# Altium PCB A313_3.PcbDoc (part 1 of 3)
Units mm, origin at the board's own origin, x right, y up, seen from the top; angles counter-clockwise.
Board outline 230.01 x 157.01 mm, 2 copper layers (Top Layer, Bottom Layer); 198 components, 173 nets, 1021 pads, 579 vias.
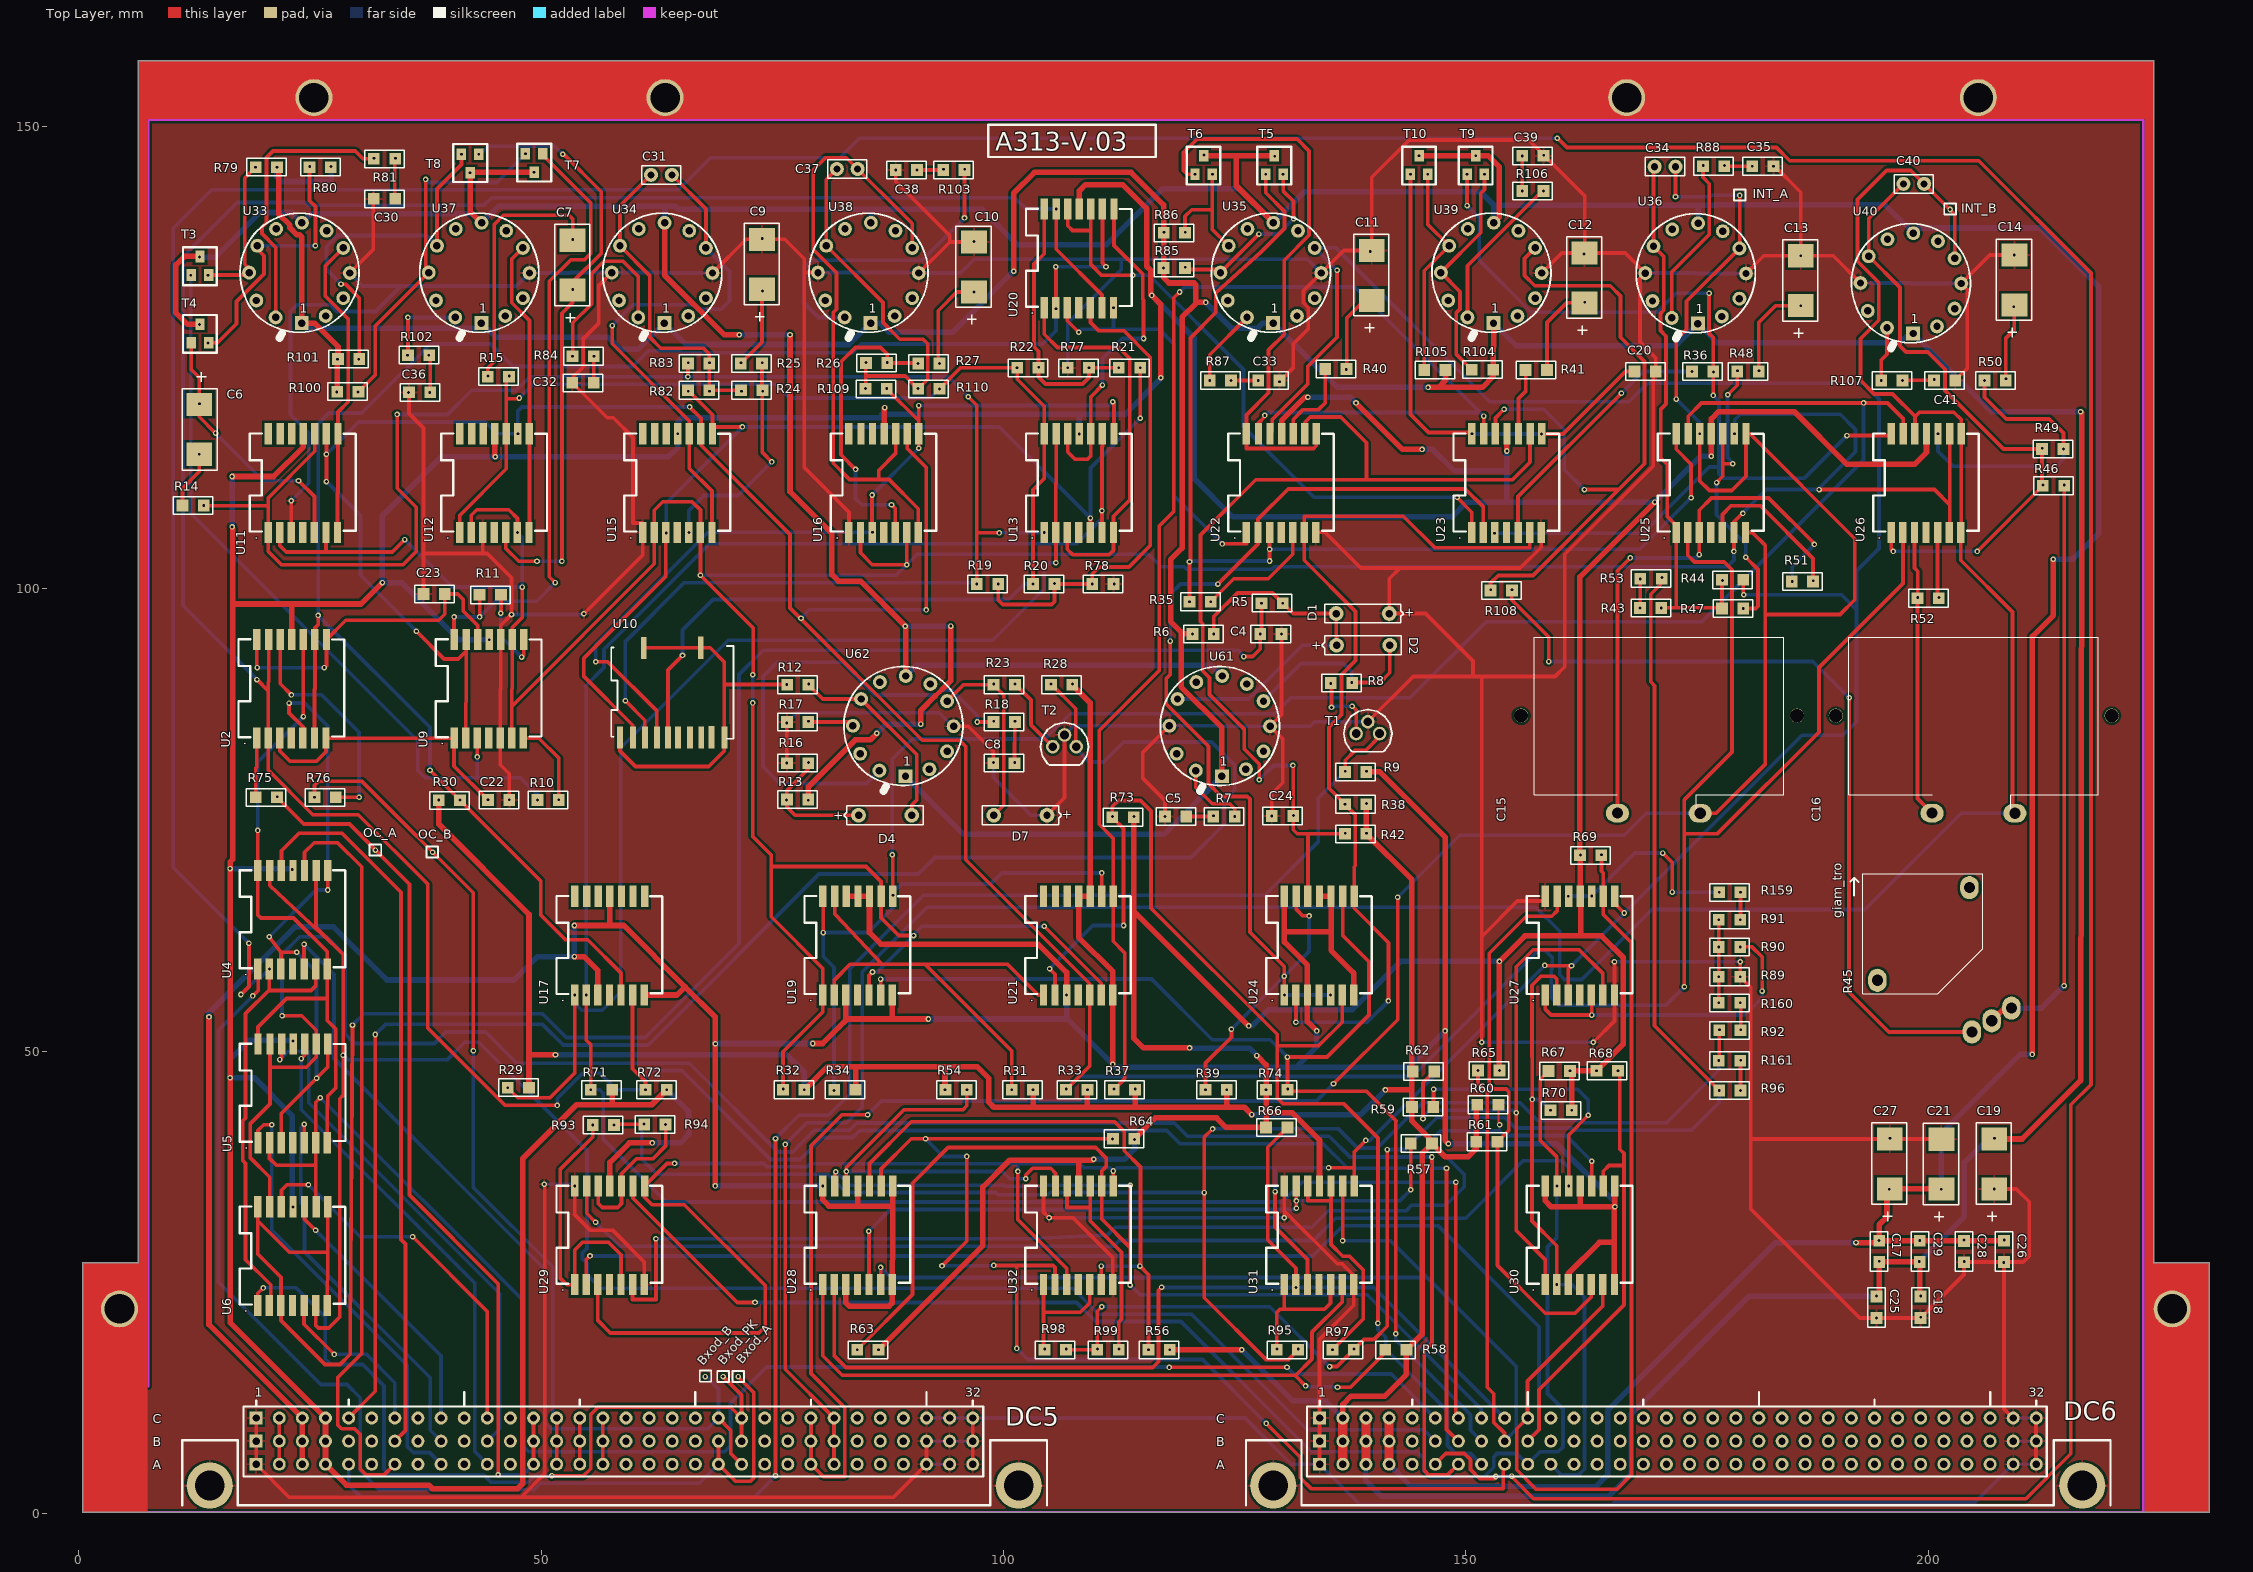
[diagram p0: Top Layer view]
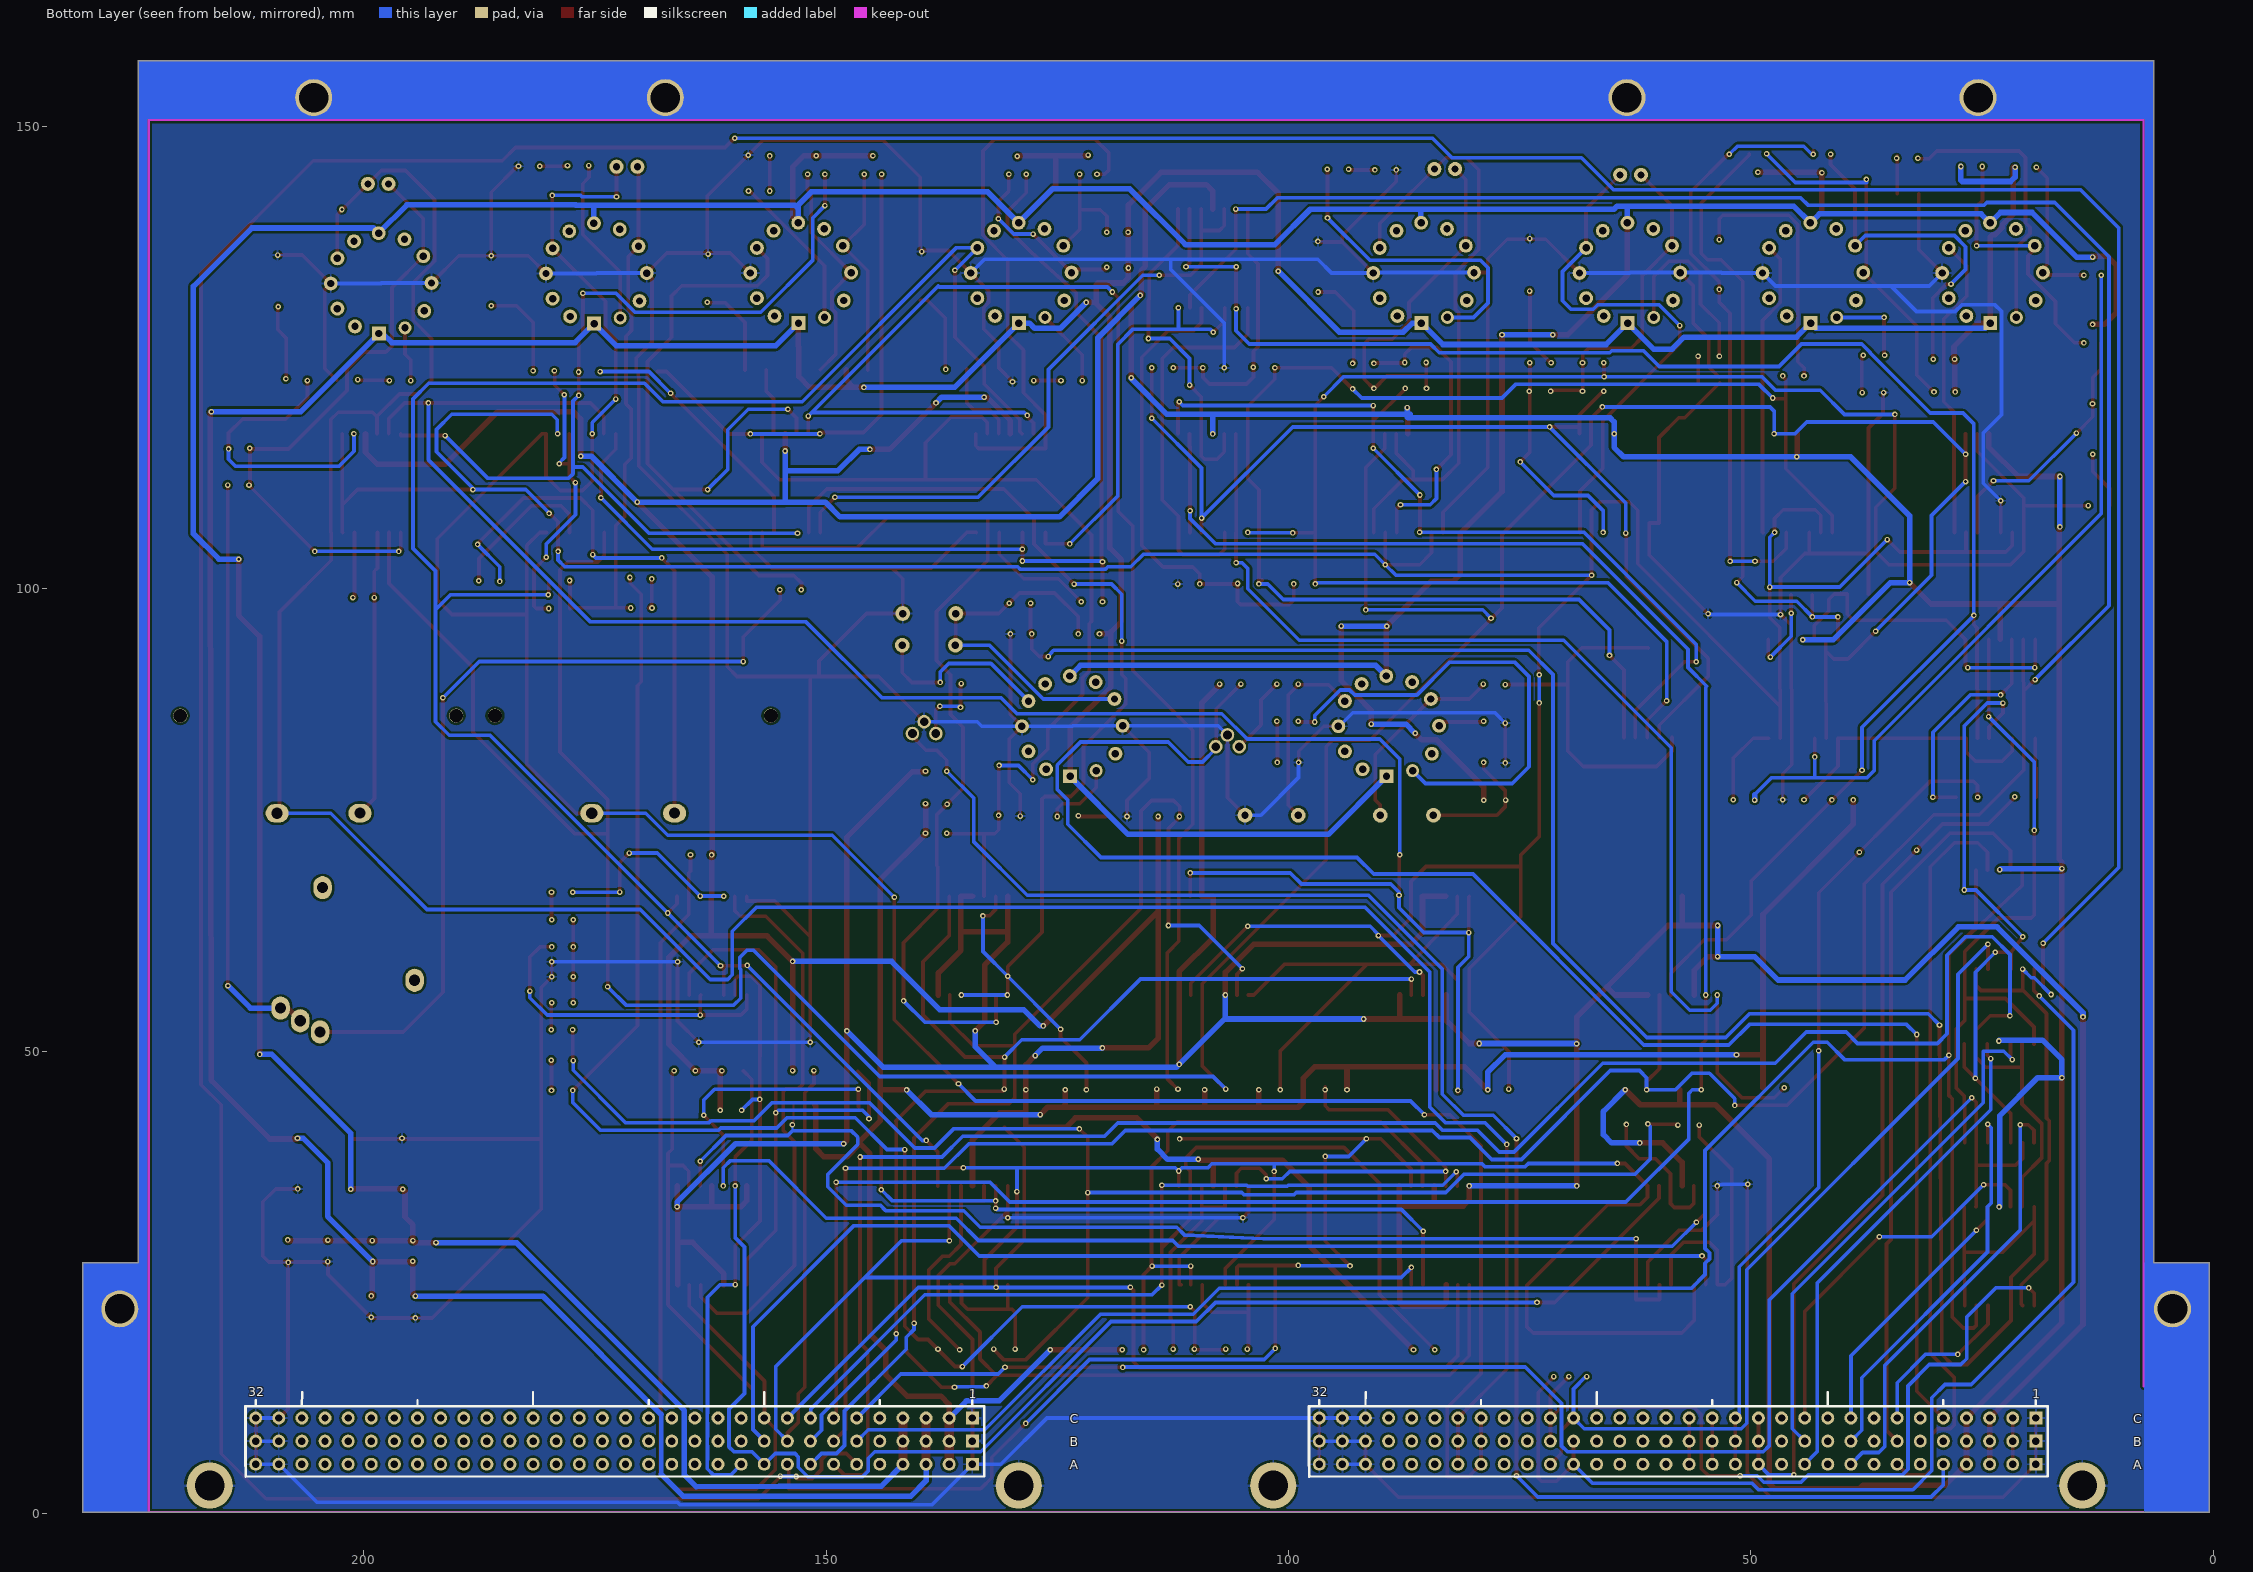
[diagram p1: Bottom Layer view, seen from below]

## Layer stack, top to bottom
Top Solder: solder mask 0.0102, Solder Resist, Dk 3.5
Top Layer: signal copper 0.0356
Dielectric 1: dielectric 0.32, FR-4, Dk 4.8
Bottom Layer: signal copper 0.0356
Bottom Solder: solder mask 0.0102, Solder Resist, Dk 3.5

## Board outline
0.405,0.121 0.405,27.121 cw(c0.412,27.121) 0.412,27.128 6.405,27.128 6.405,157.121 cw(c6.412,157.121) 6.412,157.128 224.412,157.128 cw(c224.412,157.121) 224.419,157.121 224.419,27.128 230.412,27.128 cw(c230.412,27.121) 230.419,27.121 230.419,0.121 cw(c230.412,0.121) 230.412,0.114 0.412,0.114 cw(c0.412,0.121)

## Design rules (kind name [scope] priority, off if disabled: settings)
Clearance [All] p1: gap=0.254 ignorepadtopadclearanceinfootprint=FALSE except(0: Arc-Hole Track-Hole SMDPad-Hole THPad-Hole Via-Hole Fill-Hole Poly-Hole Region-Hole Text-Hole; 0.1: Arc-SMDPad Arc-THPad Track-SMDPad Track-THPad SMDPad-THPad THPad-THPad; 0.4: Arc-Arc Arc-Track Track-Track)
HoleSize [All] p1: absolutevalues=TRUE maxlimit=5 minlimit=0.025 maxpercent=80.000 minpercent=20.000
MinimumSolderMaskSliver [All] p1: minsoldermaskwidth=0.01
PolygonConnect [All] p1: connectstyle=Relief reliefconductorwidth=0.254 reliefentries=4 polygonreliefangle="90 Angle" airgapwidth=0.254
RoutingVias [All] p1: holewidth=0.3 width=0.6 viastyle="Through Hole" minholewidth=0.3 minwidth=0.6 maxholewidth=0.3 maxwidth=0.6
SilkToSilkClearance [All] p1: silktosilkclearance=0.1
SilkToSolderMaskClearance [IsPad] p1: minsilkscreentomaskgap=0 clearancetoexposedcopper=TRUE
SolderMaskExpansion [All] p1: expansion=0.102
Width [All] p1: maxlimit=1 minlimit=0.254 preferedwidth=0.4
26 further rules are at their usual default settings.

## Components (designator, comment, footprint, x,y, rotation, side; value= is the part's Value field where it differs from the comment)
C4 "0,022uf" "RES_cap 0805" 128.068,89.907 r180 top
C5 "3300pf" "RES_cap 0805" 119.475,80.593 r0 top
C6 "10uf" cap1206 19.761,108.42 r270 top
C7 "10uf" cap1206 46.661,143.83 r90 top
C8 "3300pf" "RES_cap 0805" 100.897,86.368 r0 top
C9 "10uf" cap1206 67.136,143.93 r90 top
C10 "10uf" cap1206 90.061,143.63 r90 top
C11 "10uf" cap1206 133.086,142.73 r90 top
C12 "10uf" cap1206 156.111,142.455 r90 top
C13 "10uf" cap1206 179.486,142.155 r90 top
C14 "10uf" cap1206 202.586,142.23 r90 top
C15 "0,1uF/2%" K71-7 246.154,147.238 r90 top
C16 "0,1uF/2%" K71-7 280.181,147.238 r90 top
C17 "0,047uf" "RES_cap 0805" 199.918,27.5 r270 top
C18 "0,047uf" "RES_cap 0805" 204.393,21.45 r270 top
C19 "22uf" cap1206 200.411,46.63 r90 top
C20 "3300pf" "RES_cap 0805" 170.25,128.718 r0 top
C21 "22uf" cap1206 194.686,46.605 r90 top
C22 "0.01uf" "RES_cap 0805" 46.257,82.368 r0 top
C23 "0,01uf" "RES_cap 0805" 39.282,104.668 r0 top
C24 "560pf" "RES_cap 0805" 131.025,80.643 r0 top
C25 "0,047uf" "RES_cap 0805" 199.643,21.45 r270 top
C26 "0,047uf" "RES_cap 0805" 213.418,27.5 r270 top
C27 "22uf" cap1206 189.111,46.63 r90 top
C28 "0,01uf" "RES_cap 0805" 198.657,29.172 r90 top
C29 "0,01uf" "RES_cap 0805" 204.318,27.5 r270 top
C30 "3300pf" "RES_cap 0805" 33.907,147.393 r0 top
C31 "22pf" KM-5B 58.625,146.275 r180 top
C32 "3300pf" "RES_cap 0805" 55.375,127.493 r0 top
C33 "3300pf" "RES_cap 0805" 127.843,117.307 r180 top
C34 "22pf" KM-5B 167.175,147.15 r180 top
C35 "3300pf" "RES_cap 0805" 181.268,140.482 r180 top
C36 "3300pf" "RES_cap 0805" 37.707,126.468 r0 top
C37 "22pf" KM-5B 78.725,146.9 r180 top
C38 "3300pf" "RES_cap 0805" 90.357,150.518 r0 top
C39 "3300pf" "RES_cap 0805" 156.393,141.607 r180 top
C40 "22pf" KM-5B 194.075,145.3 r180 top
C41 "3300pf" "RES_cap 0805" 200.925,117.307 r180 top
D1 "2D102A" 2D102A 141.475,97.325 r180 top
D2 "2D102A" 2D102A 136.275,93.9 r0 top
D4 "2D102A" 2D102A 84.575,75.511 r0 top
D7 "2D102A" 2D102A 104.45,75.511 r180 top
DC5 "DC96c" DC96c_DUC 53.45,23.4 r0 top
DC6 "DC96c" DC96c_DUC 168.475,23.4 r0 top
R5 "3,3k" "RES_cap 0805" 128.2,93.232 r180 top
R6 "300k" "RES_cap 0805" 122.45,100.343 r0 top
R7 "56r" "RES_cap 0805" 124.7,80.593 r0 top
R8 "5,6k" "RES_cap 0805" 137.407,95.043 r0 top
R9 "680r" "RES_cap 0805" 138.932,85.418 r0 top
R10 "3,3k" "RES_cap 0805" 49.893,71.932 r180 top
R11 "3,3k" "RES_cap 0805" 45.35,104.568 r0 top
R12 "10k" "RES_cap 0805" 76.91,84.407 r180 top
R13 "100k" "RES_cap 0805" 78.582,82.443 r0 top
R14 "100r" "RES_cap 0805" 11.5,103.782 r180 top
R15 "100r" "RES_cap 0805" 44.525,117.732 r180 top
R16 "5,6k" "RES_cap 0805" 78.582,86.368 r0 top
R17 "5,6k" "RES_cap 0805" 78.582,90.818 r0 top
R18 "56r" "RES_cap 0805" 99.225,80.382 r180 top
R19 "20k/0,5%" "RES_cap 0805" 97.418,95.307 r180 top
R20 "10k/0,5%" "RES_cap 0805" 105.207,105.743 r0 top
R21 "10k/0,5%" "RES_cap 0805" 114.482,129.118 r0 top
R22 "20k/0,5%" "RES_cap 0805" 103.482,129.118 r0 top
R23 "5,6k" "RES_cap 0805" 99.225,84.407 r180 top
R24 "220k" "RES_cap 0805" 71.918,116.257 r180 top
R25 "100r" "RES_cap 0805" 73.59,129.593 r0 top
R26 "220k" "RES_cap 0805" 85.418,119.207 r180 top
R27 "100r" "RES_cap 0805" 91.068,119.157 r180 top
R28 "680r" "RES_cap 0805" 107.132,94.843 r0 top
R29 "10k" "RES_cap 0805" 48.382,51.268 r0 top
R30 "10k" "RES_cap 0805" 39.225,71.907 r180 top
R31 "10k" "RES_cap 0805" 102.9,51.043 r0 top
R32 "10k" "RES_cap 0805" 78.157,51.043 r0 top
R33 "10k" "RES_cap 0805" 108.775,51.043 r0 top
R34 "10k" "RES_cap 0805" 83.707,51.043 r0 top
R35 "150r" "RES_cap 0805" 122.125,103.818 r0 top
R36 "150r" "RES_cap 0805" 174.75,118.282 r180 top
R37 "10k" "RES_cap 0805" 113.932,51.043 r0 top
R38 "10k" "RES_cap 0805" 138.932,81.918 r0 top
R39 "10k" "RES_cap 0805" 123.857,51.043 r0 top
R40 "100r" "RES_cap 0805" 135.1,118.557 r180 top
R41 "100r" "RES_cap 0805" 156.768,118.457 r180 top
R42 "10k" "RES_cap 0805" 138.932,78.718 r0 top
R43 "45,3k/1%" "RES_cap 0805" 170.847,103.143 r0 top
R44 "10k/1%" "RES_cap 0805" 178,95.757 r180 top
R45 "1,5k" CP53 199.025,57.3 r90 top
R46 "8,25k/1%" "RES_cap 0805" 212.7,105.932 r180 top
R47 "220k" "RES_cap 0805" 179.707,103.093 r0 top
R48 "100r" "RES_cap 0805" 181.375,128.718 r0 top
R49 "220k" "RES_cap 0805" 214.332,120.343 r0 top
R50 "100r" "RES_cap 0805" 208.107,127.743 r0 top
R51 "330r" "RES_cap 0805" 187.257,106.018 r0 top
R52 "330r" "RES_cap 0805" 200.857,104.193 r0 top
R53 "0r" "RES_cap 0805" 169.175,95.882 r180 top
R54 "10k" "RES_cap 0805" 95.732,51.043 r0 top
R56 "10k" "RES_cap 0805" 115.975,12.482 r180 top
R57 "10k" "RES_cap 0805" 144.343,34.782 r180 top
R58 "10k" "RES_cap 0805" 141.575,12.482 r180 top
R59 "10k" "RES_cap 0805" 146.182,49.168 r0 top
R60 "10k" "RES_cap 0805" 153.232,49.418 r0 top
R61 "10k" "RES_cap 0805" 153.125,45.418 r0 top
R62 "10k" "RES_cap 0805" 146.275,53.018 r0 top
R63 "330k" "RES_cap 0805" 86.182,22.918 r0 top
R64 "330k" "RES_cap 0805" 113.85,45.743 r0 top
R65 "330k" "RES_cap 0805" 153.332,53.118 r0 top
R66 "330k" "RES_cap 0805" 128.7,36.532 r180 top
R67 "330k" "RES_cap 0805" 160.957,53.068 r0 top
R68 "330k" "RES_cap 0805" 164.443,42.657 r180 top
R69 "330k" "RES_cap 0805" 162.643,65.957 r180 top
R70 "330k" "RES_cap 0805" 161.157,48.818 r0 top
R71 "330k" "RES_cap 0805" 57.382,51.043 r0 top
R72 "330k" "RES_cap 0805" 63.282,51.043 r0 top
R73 "330k" "RES_cap 0805" 113.782,80.518 r0 top
R74 "330k" "RES_cap 0805" 130.407,51.043 r0 top
R75 "3,3k" "RES_cap 0805" 19.418,72.232 r180 top
R76 "3,3k" "RES_cap 0805" 27.482,82.668 r0 top
R77 "20k/0,5%" "RES_cap 0805" 108.957,129.118 r0 top
R78 "20k/0,5%" "RES_cap 0805" 109.9,95.307 r180 top
R79 "1Mom" "RES_cap 0805" 21.125,150.818 r0 top
R80 "1Mom" "RES_cap 0805" 26.95,150.818 r0 top
R81 "56r" "RES_cap 0805" 33.907,151.718 r0 top
R82 "10k" "RES_cap 0805" 67.882,126.693 r0 top
R83 "10k" "RES_cap 0805" 67.882,129.593 r0 top
R84 "56r" "RES_cap 0805" 55.4,130.368 r0 top
R85 "1Mom" "RES_cap 0805" 117.618,129.482 r180 top
R86 "1Mom" "RES_cap 0805" 117.625,133.282 r180 top
R87 "56r" "RES_cap 0805" 124.307,127.743 r0 top
R88 "56r" "RES_cap 0805" 177.65,150.918 r0 top
R89 "20k/5%" "RES_cap 0805" 179.372,63.268 r0 top
R90 "20k/5%" "RES_cap 0805" 179.372,66.493 r0 top
R91 "4,6k(5k)" "RES_cap 0805" 179.372,69.418 r0 top
R92 "35k" "RES_cap 0805" 177.7,47.032 r180 top
R93 "40k" "RES_cap 0805" 55.875,36.782 r180 top
R94 "20k" "RES_cap 0805" 63.157,47.293 r0 top
R95 "10k" "RES_cap 0805" 129.85,12.482 r180 top
R96 "35k" "RES_cap 0805" 177.7,40.532 r180 top
R97 "40k" "RES_cap 0805" 135.875,12.482 r180 top
R98 "20k" "RES_cap 0805" 104.743,12.482 r180 top
R99 "10k" "RES_cap 0805" 112.157,22.918 r0 top
R100 "1Mom" "RES_cap 0805" 28.243,116.107 r180 top
R101 "1Mom" "RES_cap 0805" 28.325,119.632 r180 top
R102 "56r" "RES_cap 0805" 37.6,130.493 r0 top
R103 "56r" "RES_cap 0805" 93.775,140.082 r180 top
R104 "1Mom" "RES_cap 0805" 152.657,128.918 r0 top
R105 "1Mom" "RES_cap 0805" 147.507,128.893 r0 top
R106 "56r" "RES_cap 0805" 156.393,137.807 r180 top
R107 "56r" "RES_cap 0805" 196.932,127.743 r0 top
R108 "0r" "RES_cap 0805" 154.682,105.043 r0 top
R109 "10k" "RES_cap 0805" 85.375,116.407 r180 top
R110 "10k" "RES_cap 0805" 91.068,116.407 r180 top
R159 "4,6k(5k)" "RES_cap 0805" 177.7,61.957 r180 top
R160 "0r" "RES_cap 0805" 179.372,60.443 r0 top
R161 "0r" "RES_cap 0805" 179.372,54.193 r0 top
T1 "2T312B" 2T312b 138.396,83.301 r0 top
T2 "2T312B" 2T312b 105.591,81.881 r0 top
T3 "C1815" C1815 12.16,133.943 r0 top
T4 "C1815" C1815 12.16,126.618 r0 top
T5 "C1815" C1815 128.36,144.825 r0 top
T6 "C1815" C1815 120.71,144.825 r0 top
T7 "C1815" C1815 50.175,147.05 r180 top
T8 "C1815" C1815 43.255,147 r180 top
T9 "C1815" C1815 150.135,144.825 r0 top
T10 "C1815" C1815 144.01,144.825 r0 top
U2 "168KT2b_4" 168KT 24.307,92.625 r90 top
U4 "168KT2b_4" 168KT 24.432,67.65 r90 top
U5 "168KT2b_4" 168KT 24.45,48.875 r90 top
U6 "168KT2b_4" 168KT 24.432,31.275 r90 top
U9 "168KT2b_4" 168KT 45.657,92.625 r90 top
U10 "2d917A" 2D917A 74.134,87.98 r0 top
U11 "168KT2b_4" 168KT 25.55,114.875 r90 top
U12 "168KT2b_4" 168KT 46.257,114.875 r90 top
U13 "168KT2b_4" 168KT 109.475,114.875 r90 top
U15 "168KT2b_4" 168KT 66.05,114.875 r90 top
U16 "168KT2b_4" 168KT 88.36,114.875 r90 top
U17 "168KT2v_4" 168KT 58.71,64.85 r90 top
U19 "168KT2v_4" 168KT 85.535,64.85 r90 top
U20 "168KT2b_4" 168KT 109.475,139.175 r90 top
U21 "168KT2v_4" 168KT 109.4,64.85 r90 top
U22 "168KT2b_4" 168KT 131.35,114.875 r90 top
U23 "168KT2b_4" 168KT 155.725,114.875 r90 top
U24 "168KT2v_4" 168KT 135.45,64.85 r90 top
U25 "168KT2b_4" 168KT 177.825,114.875 r90 top
U26 "168KT2b_4" 168KT 201.097,114.875 r90 top
U27 "168KT2b_4" 168KT 163.65,64.85 r90 top
U28 "168KT2v_4" 168KT 85.535,33.525 r90 top
U29 "168KT2b_4" 168KT 58.71,33.525 r90 top
U30 "168KT2v_4" 168KT 163.65,33.525 r90 top
U31 "168KT2b_4" 168KT 135.45,33.525 r90 top
U32 "168KT2b_4" 168KT 109.4,33.525 r90 top
U33 "140YD1B" 140YD1B 37.333,121.352 r0 top
U34 "140YD1B" 140YD1B 76.555,121.352 r0 top
U35 "140YD1B" 140YD1B 142.388,121.352 r0 top
U36 "140YD1B" 140YD1B 188.33,121.298 r0 top
U37 "140YD1B" 140YD1B 56.762,121.352 r0 top
U38 "140YD1B" 140YD1B 98.865,121.352 r0 top
U39 "140YD1B" 140YD1B 166.23,121.352 r0 top
U40 "140YD1B" 140YD1B 211.603,120.224 r0 top
U61 "140YD1B" 140YD1B 136.858,72.338 r0 top
U62 "140YD1B" 140YD1B 102.634,72.338 r0 top

## Footprints (in the part's own frame and the unit in brackets; to place one, negate y for a bottom-side part, rotate by r counter-clockwise, add the part's x,y. Pads: shape width x height; smd on the part's side, far side on the other; paste and mask are expansions set on the pad)
2D102A [mm]
  round 1.6 hole 0.8 mask+0.15: 1(-0.25,0) 2(5.5,0)
  silkscreen extent -1.83,-1.02 6.75,1.02
2D917A [mil]
  rect 25x95 smd mask+5.91: 1(-559.8,-160.12) 2(-508.62,-160.12) 3(-457.45,-160.12) 4(-410.2,-160.12) 5(-366.9,-160.12) 6(-315.72,-160.12) 7(-268.47,-160.12) 8(-224.6,-159) 9(-170.33,-160.07) 10(-614.8,-160.07) 11(-270.6,222.2) 12(-513.13,220.9)
  silkscreen extent -652,-165 -131,230
2T312b [mil]
  round 58 hole 37 mask+5.91: 1(-10.29,41.29) 2(39.71,91.29) 3(89.71,41.29)
  silkscreen extent -63,-36 142,144
140YD1B [mm]
  rect 1.5x1.5 hole 0.8 mask+0.15: 1(-13.233,7.391)
  round 1.5 hole 0.8 mask+0.15: 2(-10.643,8.153) 3(-8.738,10.084) 4(-8.026,12.802) 5(-8.738,15.519) 6(-10.541,17.374) 7(-13.208,18.237) 8(-16.002,17.577) 9(-18.034,15.748) 10(-18.923,12.852) 11(-18.136,9.83)
  round 1.5 / inner round 1.4 / far side round 1.4 hole 0.8 mask+0.15: 12(-16.053,8.001)
  silkscreen extent -19.9,5.79 -7.03,19.26
168KT [mm]
  rect 2.286x0.8 smd mask+0.15: 1(-8.775,5.075) 2(-8.775,3.825) 3(-8.775,2.575) 4(-8.775,1.325) 5(-8.775,0.075) 6(-8.775,-1.175) 7(-8.775,-2.425) 8(1.9,-2.475) 9(1.9,-1.225) 10(1.9,0.025) 11(1.9,1.275) 12(1.9,2.525) 13(1.9,3.775) 14(1.9,5.075)
  silkscreen extent -8.67,-4.38 1.92,7.05
C1815 [mil]
  rect 40x50 smd mask+5.91: 1(0,0) 2(37,79) 3(74,0)
  silkscreen extent -35,-43 108,118
cap1206 [mm]
  rect 2.5x2.8 smd mask+0.15: 1(-11.53,-6.739) 2(-6.13,-6.739)
  silkscreen extent -15,-8.6 -4.4,-4.8
CP53 [mm]
  oval 2.5x2 / inner round 1.575 / far side oval 2.5x2 hole 1.2: 1(-5.222,-5.717) 2(-4.016,-7.852) 3(-2.646,-9.987)
  oval 2.5x2 / inner round 2.108 / far side oval 2.5x2 hole 1.2: 4(10.38,-5.442) 5(0.363,4.519)
  silkscreen extent -1.1,-6.91 11.9,6.09
DC96c_DUC [mm]
  round 5 hole 3.2: A(-39.3,-20.375) B(48.2,-20.375)
  rect 1.4x1.4 hole 0.8: A1(-34.275,-18.075) B1(-34.275,-15.575) C1(-34.275,-13.075)
  round 1.4 hole 0.8: A2(-31.775,-18.075) A3(-29.275,-18.075) A4(-26.775,-18.075) A5(-24.275,-18.075) A6(-21.775,-18.075) A7(-19.275,-18.075) A8(-16.775,-18.075) A9(-14.275,-18.075) A10(-11.775,-18.075) A11(-9.275,-18.075) A12(-6.775,-18.075) A13(-4.275,-18.075) A14(-1.775,-18.075) A15(0.725,-18.075) A16(3.225,-18.075) A17(5.725,-18.075) A18(8.225,-18.075) A19(10.725,-18.075) A20(13.225,-18.075) A21(15.725,-18.075) A22(18.225,-18.075) A23(20.725,-18.075) A24(23.225,-18.075) A25(25.725,-18.075) A26(28.225,-18.075) A27(30.725,-18.075) A28(33.225,-18.075) A29(35.725,-18.075) A30(38.225,-18.075) A31(40.725,-18.075) A32(43.225,-18.075) B2(-31.775,-15.575) B3(-29.275,-15.575) B4(-26.775,-15.575) B5(-24.275,-15.575) B6(-21.775,-15.575) B7(-19.275,-15.575) B8(-16.775,-15.575) B9(-14.275,-15.575) B10(-11.775,-15.575) B11(-9.275,-15.575) B12(-6.775,-15.575) B13(-4.275,-15.575) B14(-1.775,-15.575) B15(0.725,-15.575) B16(3.225,-15.575) B17(5.725,-15.575) B18(8.225,-15.575) B19(10.725,-15.575) B20(13.225,-15.575) B21(15.725,-15.575) B22(18.225,-15.575) B23(20.725,-15.575) B24(23.225,-15.575) B25(25.725,-15.575) B26(28.225,-15.575) B27(30.725,-15.575) B28(33.225,-15.575) B29(35.725,-15.575) B30(38.225,-15.575) B31(40.725,-15.575) B32(43.225,-15.575) C2(-31.775,-13.075) C3(-29.275,-13.075) C4(-26.775,-13.075) C5(-24.275,-13.075) C6(-21.775,-13.075) C7(-19.275,-13.075) C8(-16.775,-13.075) C9(-14.275,-13.075) C10(-11.775,-13.075) C11(-9.275,-13.075) C12(-6.775,-13.075) C13(-4.275,-13.075) C14(-1.775,-13.075) C15(0.725,-13.075) C16(3.225,-13.075) C17(5.725,-13.075) C18(8.225,-13.075) C19(10.725,-13.075) C20(13.225,-13.075) C21(15.725,-13.075) C22(18.225,-13.075) C23(20.725,-13.075) C24(23.225,-13.075) C25(25.725,-13.075) C26(28.225,-13.075) C27(30.725,-13.075) C28(33.225,-13.075) C29(35.725,-13.075) C30(38.225,-13.075) C31(40.725,-13.075) C32(43.225,-13.075)
  silkscreen extent -42.25,-22.5 51.25,-10.3
K71-7 [mil]
  oval 78.73x98.42 / inner round 62 / far side oval 78.73x98.42 hole 47.23 mask+5.91: 1(-2815,3140) 2(-2815.47,2787.57)
  round 60 hole 59.06: ""(-2400,2375) ""(-2400,3550)
  silkscreen extent -2795,2431 -2067,3494
KM-5B [mil]
  round 60 hole 30 mask+5.91: 1(-216.54,59.06) 2(-127.95,59.06)
  silkscreen extent -255,20 -89,98
"RES_cap 0805" [mm]
  rect 1.27x1.27 smd mask+0.15: 1(-2.007,-5.218) 2(0.3,-5.218)
  silkscreen extent -2.97,-6.17 1.3,-4.27

## Part data
C4 C5 C8 C15 C16 C17 C18 C20 C22 C23 C24 C25 C26 C28 C29 C30 C31 C32 C33 C34 C35 C36 C37 C38 C39 C40 C41: library part "CAP NP"
C6 C7 C9 C10 C11 C12 C13 C14: library part CAP
C19 C21 C27: library part C
D1 D2 D4 D7: library part DIODE
R5 R6 R7 R8 R9 R10 R11 R12 R13 R14 R15 R16 R17 R18 R19 R20 R21 R22 R23 R24 R25 R26 R27 R28 R29 R30 R31 R32 R33 R34 R35 R36 R37 R38 R39 R40 R41 R42 R43 R44 R46 R47 R48 R49 R50 R51 R52 R53 R54 R56 R57 R58 R59 R60 R61 R62 R63 R64 R65 R66 R67 R68 R69 R70 R71 R72 R73 R74 R75 R76 R77 R78 R79 R80 R81 R82 R83 R84 R85 R86 R87 R88 R89 R90 R91 R92 R93 R94 R95 R96 R97 R98 R99 R100 R101 R102 R103 R104 R105 R106 R107 R108 R109 R110 R159 R160 R161: library part R
R45: library part "RESISTOR VAR"
T1: library part 1R1001_2
T2: library part 1R1001_1
T3 T4 T5 T6 T7 T8 T9 T10: library part 1R1001
U10: library part LDS-A81R_4
U17: library part 168KT2b_10
U19: library part 168KT2b_12
U21: library part 168KT2b_18
U24: library part 168KT2b_20
U28: library part 168KT2b_27
U30: library part 168KT2b_31
U33 U34 U35 U36 U37 U38 U39 U40 U61 U62: library part 140YD1B_0

## Free pads (board coordinates)
  round 4 hole 3.2: ck(4.4,22.125) ck(25.425,153.125) ck(63.4,153.125) ck(167.4,153.125) ck(205.425,153.125) ck(226.4,22.125)

## Via types
v1: diameter 0.6, hole 0.3, Top Layer to Bottom Layer, 579 vias

## Nets (pads, with @x,y where several pads share a name; then routed paths per layer and width w, separated by ;. In a path a pad name is that pad's centre, name@x,y a point inside that pad or via, vN(x,y) a via of type N, cw(c..) or ccw(c..) an arc to the next point about the centre after c; other vN are vias at no path point)
1: R21.2 R82.1 U10.1 U13.5 U15.3 U15.8 | length 113.9
  Top Layer w0.4: U10.1@59.915,83.914 59.915,85.256 54.59,90.581 54.59,92.454 63.475,101.339 U15.3@63.475,106.1 ; R82.1@65.875,121.475 68.525,118.825 U15.8@68.525,117.512 ; U15.8@68.525,116.775 U15.8@68.525,117.512 ; v1(71.76,117.512) U15.8@68.525,117.512 ; U13.5@109.4,106.1 v1(109.4,107.657) ; v1(114.782,118.446) R21.2@114.782,124.075
  Bottom Layer w0.4: v1(63.525,106.025) 63.525,109.277 v1(71.76,117.512) 99.545,117.512 v1(109.4,107.657) 109.4,113.064 v1(114.782,118.446)
  other v1: 65.903,121.356 114.782,123.9
2: R14.1 R19.2 R83.1 U10.2 U11.1 U11.10 U13.1 | length 200.6
  Top Layer w0.4: v1(13.507,109) 20.475,109 ; U11.10@25.525,116.775 25.525,114.875 20.475,109.825 20.475,109 ; v1(34.422,118.858) 34.422,110.883 36.48,108.825 36.48,104.05 35.02,102.59 21.935,102.59 20.475,104.05 20.475,109 ; v1(59.107,87.896) 61.215,85.787 U10.2@61.215,83.914 ; v1(65.875,122.93) R83.1@65.875,124.375 ; v1(96.199,120.785) 97.118,119.866 97.118,106 ; v1(97.118,100.525) 97.118,106 ; v1(99.55,106.05) 97.168,106.05 97.118,106 ; U13.1@104.25,105.95 v1(104.4,106.1)
  Bottom Layer w0.4: v1(34.422,118.858) 39.866,118.858 42.483,121.475 47.338,121.475 48.792,122.93 v1(65.875,122.93) 94.054,122.93 v1(96.199,120.785) ; v1(59.107,87.896) 59.107,94.317 65.449,100.659 96.984,100.659 v1(97.118,100.525) ; v1(99.55,106.05) 104.25,106.05 104.3,106 v1(104.4,106.1)
  other v1: 65.9,124.45
3: R109.1 U10.3 U13.8 U16.3 U16.8 | length 93.9
  Top Layer w0.4: v1(55.911,92.112) 57.181,92.112 62.514,86.778 U10.3@62.514,83.914 ; U16.3@85.785,106.1 v1(85.785,110.146) ; R109.1@87.382,121.625 90.835,118.173 ; v1(90.835,115.196) 90.835,118.173 ; v1(90.835,119.823) 90.835,118.173 ; v1(111.825,120.225) 111.95,120.1 U13.8@111.95,116.775
  Bottom Layer w0.4: v1(55.911,92.112) 55.911,93.986 68.05,106.125 v1(85.825,106.125) ; v1(85.785,110.146) v1(90.835,115.196) ; v1(90.835,119.823) 90.847,119.836 111.436,119.836 v1(111.825,120.225)
  other v1: 87.382,121.675
4: R15.1 R20.1 R22.1 R110.1 U10.4 U12.1 U12.10 U13.14 | length 154.7
  Top Layer w0.4: U12.1@41.182,106.1 41.182,107.932 46.232,112.982 46.232,120.55 ; R15.1@46.532,122.95 46.232,122.65 46.232,120.55 ; v1(47.63,120.636) 47.544,120.55 46.232,120.55 ; U10.4@63.715,83.914 63.714,91.229 v1(65.283,92.798) ; v1(93.075,121.625) 95.35,123.9 v1(101.475,123.9) 101.475,122.672 104.4,119.747 104.4,111.924 103.2,110.724 R20.1@103.2,100.625 ; R20.1@102.875,100.95 R20.1@103.2,100.625 ; v1(103.2,100.525) R20.1@103.2,100.625
  Bottom Layer w0.4: v1(47.63,120.636) 49.104,122.11 75.44,122.11 76.914,120.636 92.086,120.636 v1(93.075,121.625) ; v1(65.283,92.798) 65.283,95.541 68.592,98.85 100.568,98.85 102.243,100.525 v1(103.2,100.525)
  other v1: 46.557,123.025
+3,5V: DC5.A3 DC5.B3 DC5.C3 R9.2 R28.2 U17.3 U17.7 U17.11 U19.3 U19.7 U19.10 U19.11 U19.12 U21.3 U21.7 U21.10 U21.11 U24.3 U24.7 U24.10 U24.11 U24.14 U28.3 U28.7 U28.8 U28.11 U28.14 U30.3 U30.7 U30.8 U30.11 U30.14 | length 501.6
  Top Layer w0.6: v1(14.077,53.707) 14.077,20.423 DC5.C3@24.175,10.325 DC5.A3@24.175,5.325 ; v1(53.599,60.23) 54.629,60.23 56.135,58.725 U17.3@56.135,56.075 ; v1(53.599,63.588) 57.425,63.588 ; U17.11@57.435,66.75 57.435,63.597 57.425,63.588 ; U17.7@61.135,56.075 64.687,56.075 65.568,56.957 ; v1(68.825,35.425) v1@68.825,50.8 ; v1@68.825,50.928 68.825,53.7 65.568,56.957 ; v1(79.375,50.825) 80.442,50.825 82.285,52.667 ; v1(80.46,35.425) 80.46,33.915 81.125,33.25 84.26,33.25 ; U28.3@82.96,24.75 82.96,22.783 83.317,22.425 87.627,22.425 87.96,22.757 U28.7@87.96,24.75 88.01,30.11 88.01,33.25 ; U19.3@82.96,56.075 82.96,53.342 82.285,52.667 ; U19.12@83.01,66.75 U19.11@84.26,66.75 U19.10@85.51,66.75 85.51,62.818 86.746,61.581 103.755,61.581 106.825,58.511 v1(106.825,56.075) ; U28.11@84.26,35.425 84.26,33.25 ; U19.7@87.96,56.075 87.96,53.475 ; U28.8@88.01,35.425 88.01,33.25 ; v1(91.875,53.475) 87.96,53.475 ; R28.2@107.432,89.625 109.375,87.682 U21.10@109.375,66.75 U21.11@108.125,66.75 108.125,62.305 111.825,58.605 v1(111.825,48.56) ; U24.14@130.375,66.75 130.375,62.9 ; v1(133.889,52.183) 132.875,53.197 132.875,59.295 130.375,61.795 130.375,62.9 ; U24.11@134.175,66.75 U24.10@135.425,66.75 135.425,62.85 ; U24.7@137.875,56.075 137.875,58.45 135.425,60.9 135.425,62.85 ; R9.2@139.232,80.2 140.7,80.2 147.757,73.143 v1(147.757,52.183) 147.757,48.671 147.764,48.664 147.764,46.936 147.757,46.929 147.757,40.347 v1(148.116,39.988) ; U30.14@158.575,35.425 158.575,33.825 159.225,33.175 162.375,33.175 ; U30.3@161.075,24.75 161.075,25.951 164.449,29.325 166.075,29.325 ; U30.11@162.375,35.425 162.375,33.175 ; U30.7@166.075,24.75 166.075,29.325 ; U30.8@166.125,35.425 v1(166.125,33.175) ; 57.425,63.588 58.937,63.588 65.568,56.957 ; 82.285,52.667 83.114,53.475 87.96,53.475 ; 84.26,33.25 88.01,33.25 ; 130.375,62.9 135.375,62.9 135.425,62.85 ; 162.375,33.175 v1(166.125,33.175) ; 166.075,29.325 166.075,33.125 v1(166.125,33.175)
  Bottom Layer w0.6: v1(14.077,53.707) 14.077,54.152 23.375,63.45 27.55,63.45 33.305,57.695 47.05,57.695 49.585,60.23 v1(53.599,60.23) v1(53.599,63.588) ; v1(68.825,35.425) v1(80.46,35.425) ; v1(68.85,50.8) 68.875,50.825 v1(79.375,50.825) ; v1(91.875,53.475) 106.91,53.475 ; v1(106.825,56.075) 106.825,53.56 106.91,53.475 ; v1(133.889,52.183) 133.889,50.489 131.65,48.25 ; v1(147.757,52.183) 143.824,48.25 131.65,48.25 ; v1(148.116,39.988) 159.803,39.988 166.125,33.666 v1(166.125,33.175) ; 106.91,53.475 v1(111.825,48.56) 112.135,48.25 131.65,48.25
  other v1: 139.257,80.275 107.457,89.7
+5V: DC5.A2 DC5.B2 DC5.C2 | length 5
  Top Layer w0.4: DC5.A2@21.675,5.325 DC5.C2@21.675,10.325
+6,3V: DC5.A4 DC5.B4 DC5.C4 R63.2 R64.2 R65.2 R66.2 R67.2 R68.2 R69.2 R70.2 R71.2 R72.2 R73.2 R74.1 U2.11 U4.11 U5.11 U6.11 U9.11 U11.11 U12.11 U13.11 U15.11 U16.11 U20.11 U22.11 U23.11 U25.11 U26.11 U27.11 U29.11 U31.11 U32.11 | length 841.3
  Top Layer w0.4: v1(108.2,116.75) U13.11@108.2,116.775
  Top Layer w0.6: v1(16.575,112.15) 21.064,112.15 24.275,115.361 U11.11@24.275,116.775 ; v1@16.625,106.5 16.625,98.3 ; U2.11@23.032,94.525 23.032,98.3 ; v1(23.075,69.632) U4.11@23.157,69.55 ; v1(32.825,100.675) 30.511,98.361 16.686,98.361 16.625,98.3 ; 37.839,3.06 28.94,3.06 DC5.A4@26.675,5.325 DC5.C4@26.675,10.325 16.35,20.65 v1(16.35,47.125) v1(16.35,69.75) 16.35,70.475 16.625,70.75 16.625,94.736 16.625,98.3 ; 37.851,3.072 38.248,2.675 47.449,2.675 48.011,3.237 48.011,38.391 53.82,44.2 57.5,44.2 ; v1(44.382,94.482) U9.11@44.382,94.525 ; U12.11@44.982,116.775 44.982,114.344 v1(45.04,114.286) ; U29.11@57.435,35.425 57.435,37.978 59.532,40.075 v1(62.025,40.075) ; R71.2@57.682,45.825 57.682,44.382 57.5,44.2 ; v1(63.582,45.825) 61.957,44.2 57.5,44.2 ; v1(86.482,17.7) 97.77,28.988 97.77,35.318 100.677,38.225 109.675,38.225 v1(109.75,38.3) ; U16.11@87.085,116.775 87.085,119.535 v1(87.15,119.6) ; U32.11@108.125,35.425 108.125,37.375 108.125,37.925 ; U20.11@108.2,141.075 108.2,143.05 108.875,143.725 112.882,143.725 115.475,141.132 115.475,134.887 115.95,134.412 115.95,131.826 v1(116.041,131.735) ; R73.2@114.082,75.3 114.082,65.156 ; v1(114.175,40.45) 114.175,40.5 R64.2@114.15,40.525 116.4,42.775 123.044,42.775 124.069,41.75 R66.2@128.4,41.75 128.4,43.35 ; v1@116.094,131.735 116.094,131.682 117.005,130.77 v1(117.005,122.825) ; v1(120.125,50.35) 115.143,50.35 114.082,51.411 114.082,65.156 ; v1(126.525,52.725) 126.513,52.725 114.082,65.156 ; v1(127.4,49.525) 128.4,48.525 128.4,43.35 ; U22.11@130.075,116.775 130.075,118.182 132.618,120.725 v1(132.925,120.725) ; U31.11@134.175,35.425 134.175,40.391 131.216,43.35 128.4,43.35 ; v1(138.125,120.1) 143.151,115.074 v1(145.268,115.074) ; v1(153.632,47.9) v1(153.632,59.702) 156.401,62.47 162.343,62.47 ; v1(154.45,114.909) U23.11@154.45,116.775 ; v1(161.457,43.6) 161.457,47.65 R67.2@161.257,47.85 v1(161.282,47.875) v1(164.143,47.875) 167.029,50.761 167.029,60.135 164.694,62.47 162.343,62.47 ; v1(170.439,109.384) 162.343,101.287 R69.2@162.343,71.175 162.375,71.143 U27.11@162.375,66.75 162.429,66.696 162.429,62.557 162.343,62.47 ; v1(176.55,114.336) 176.55,118.372 177.35,119.172 185.518,119.172 191.221,113.469 198.544,113.469 199.822,114.747 U26.11@199.822,116.775
  Bottom Layer w0.6: v1(16.35,69.75) 22.957,69.75 v1(23.075,69.632) ; v1(16.575,106.7) v1(16.575,112.15) ; v1@23.125,51.2 18.475,51.2 16.35,49.075 v1(16.35,47.125) 18.975,47.125 23.1,43 23.1,33.2 v1(23.15,33.15) ; v1(44.382,94.482) 41.093,94.482 34.9,100.675 v1(32.825,100.675) 32.825,107.9 39.211,114.286 v1(45.04,114.286) 63.761,114.286 64.775,115.3 v1(64.775,116.775) 64.775,118.05 65.228,118.503 87.075,118.503 ; v1(62.025,40.075) 65.05,40.075 65.95,40.975 65.95,43.475 63.6,45.825 v1(63.582,45.825) ; v1(87.15,119.6) 87.15,118.875 ; v1(108.2,116.75) 108.2,118.825 108.15,118.875 ; v1(109.75,38.3) 113.075,38.3 114.175,39.4 v1(114.175,40.45) ; v1(116.041,131.735) 120.63,127.146 120.63,111.924 124.779,107.775 148.495,107.775 150.104,109.384 154.425,109.384 ; v1@117.005,122.727 113.154,118.875 108.15,118.875 ; v1(120.125,50.35) 120.15,50.325 126.6,50.325 v1(127.4,49.525) ; v1(126.525,52.725) 126.875,52.725 128.65,54.5 137.73,54.5 142.931,59.702 v1(153.632,59.702) ; v1(132.925,120.725) 137.5,120.725 v1(138.125,120.1) ; v1(145.268,115.074) 146.426,115.074 148.725,112.775 154.45,112.775 ; v1(154.45,114.909) 154.45,112.775 ; v1(176.55,114.336) 175.391,114.336 v1(170.439,109.384) 154.425,109.384 ; 87.15,118.875 86.853,118.875 87.15,118.578 87.15,118.875 ; 87.15,118.875 108.15,118.875 ; 154.425,109.384 154.45,109.409 154.45,112.775
  other v1: 128.4,45.825 23.175,51.1 162.4,71.218 114.107,75.375
+12,6V: C17.1 C21.1 C26.1 C27.1 C28.2 C29.1 DC6.A4 DC6.B4 DC6.C4 R13.2 T3.2 T4.2 T5.2 T6.2 T7.2 T8.2 T9.2 T10.2 U33.7 U34.7 U35.7 U36.7 U37.7 U38.7 U39.7 U40.7 U61.7 U62.7 | length 624.8
  Top Layer w0.254: 93.356,89.161 93.387,89.161
  Top Layer w0.4: v1(42.315,144.993) T8.2@42.365,145.043
  Top Layer w0.5: 92.602,88.407 93.356,89.161
  Top Layer w0.6: v1(13.038,128.602) 11.748,128.602 10.5,129.85 10.5,135.025 11.425,135.95 T3.2@13.1,135.95 13.1,135.902 13.077,135.878 v1(13.038,135.878) ; T4.2@13.038,128.625 T4.2@13.1,128.625 ; v1(42.315,144.993) 42.315,140.829 U37.7@43.554,139.589 ; T8.2@42.365,145.043 v1(49.235,145.043) ; U34.7@63.347,139.589 63.347,133.915 69.778,127.484 v1(71.434,127.484) ; v1(76.909,127.484) 76.909,110.509 81.438,105.98 81.438,101.537 82.15,100.825 84.55,100.825 89.426,95.949 U62.7@89.426,90.575 ; R13.2@78.882,77.225 78.882,78.582 83.975,83.675 85.6,83.675 v1(86.3,84.375) ; v1(91.05,85.375) 91.05,86.855 92.602,88.407 ; 93.387,89.161 94.3,90.074 v1(94.3,95.975) ; T6.2@121.65,146.832 125.175,146.832 ; U35.7@129.18,139.589 125.175,143.594 125.175,146.832 ; T5.2@129.3,146.697 T5.2@129.3,146.832 125.175,146.832 ; v1(144.95,146.832) 152.443,146.832 153.632,145.643 153.632,140.199 U39.7@153.022,139.589 ; v1(192.2,29.3) 194.493,29.3 v1(194.7,29.507) ; v1(195.8,35.075) 195.55,34.825 195.55,32.075 194.7,31.225 v1(194.7,29.507) ; C27.1@195.85,35.1 201.4,35.1 v1(201.425,35.075) ; C26.1@208.2,29.507 203.91,29.507 C28.2@203.875,29.472 203.84,29.507 v1(194.7,29.507) ; v1@211.283,49.65 211.283,94.855 213.543,97.116 v1(213.543,103.207)
  Top Layer w1: DC6.A4@141.7,5.325 DC6.B4@141.7,7.825 DC6.C4@141.7,10.325
  Bottom Layer w0.6: v1(13.038,135.878) 14.765,135.878 19.587,140.7 23.014,140.7 U33.7@24.125,139.589 25.086,140.55 42.593,140.55 U37.7@43.554,139.589 45.365,141.4 63.4,141.4 ; U34.7@63.347,139.589 63.347,141.347 63.4,141.4 ; v1(71.434,127.484) v1(76.909,127.484) ; U38.7@85.657,139.589 85.7,139.632 85.7,141.05 ; v1(86.3,84.375) 87.3,85.375 v1(91.05,85.375) ; v1(89.375,95.95) 89.4,95.975 v1(94.3,95.975) ; U62.7@89.426,90.575 90.566,91.715 122.51,91.715 U61.7@123.65,90.575 ; DC6.A4@141.675,5.325 144.039,2.961 155.1,2.961 164.065,2.896 165.334,4.164 165.334,11.137 183.472,29.275 192.175,29.275 v1(192.2,29.3) ; U39.7@153.022,139.589 153.022,141.15 ; U36.7@175.122,139.535 175.122,141.478 175.1,141.5 ; v1(201.425,35.075) 201.425,41.125 209.95,49.65 v1(211.25,49.65) ; v1(213.543,103.207) 215.682,103.207 218.432,105.957 218.432,132.715 212.121,139.026 198.959,139.026 U40.7@198.395,138.461 195.341,141.515 177.102,141.515 177.087,141.5 175.1,141.5 ; 63.4,141.4 64.458,141.4 64.808,141.05 85.7,141.05 ; 85.7,141.05 97.65,141.05 101.467,137.233 111.141,137.233 117.176,143.268 125.501,143.268 U35.7@129.18,139.589 132.528,142.937 151.618,142.937 153.022,141.533 153.022,141.15 ; 153.022,141.15 153.372,141.5 175.1,141.5
  other v1: 199.1,29.507 203.883,29.565 208.225,29.582 78.875,77.125 129.325,146.772 151.075,146.832 121.675,146.907
-12,6V: C17.2 C18.1 C19.2 C25.1 C29.2 DC6.A3 DC6.B3 DC6.C3 R6.1 R79.2 R80.2 R85.2 R86.2 R100.2 R101.2 R104.2 R105.2 U33.1 U34.1 U35.1 U36.1 U37.1 U38.1 U39.1 U40.1 U61.1 U62.1 | length 561.7
  Top Layer w0.6: R79.2@21.6,145.6 21.6,140.55 22.821,139.329 22.821,139.049 23.585,138.285 23.865,138.285 24.1,138.05 U33.1@24.1,128.743 25.482,128.743 28.025,126.2 R101.2@28.025,124.85 27.943,124.768 R100.2@27.943,121.325 ; v1(101.097,134.352) 101.097,142.785 103.356,145.043 113.797,145.043 117.325,141.515 117.318,141.508 117.318,138.507 R86.2@117.325,138.5 117.325,133.65 117.899,133.076 120.614,133.076 120.815,132.875 120.815,130.974 ; v1(120.443,95.125) 119.42,95.125 119.208,95.338 ; v1(121.875,130.974) 120.815,130.974 ; U61.1@123.625,79.729 123.625,84.988 119.208,89.405 119.208,95.338 ; v1(145.918,121.786) 147.036,121.786 ; R105.2@147.807,123.675 147.807,122.557 147.036,121.786 ; U39.1@152.997,128.743 152.997,126.239 152.957,126.199 152.957,122.955 151.788,121.786 147.036,121.786 ; v1(194.425,23.507) 194.7,23.782 C17.2@194.7,27.2 C29.2@199.1,27.2 ; v1(199.05,27.25) C29.2@199.1,27.2 ; C18.1@199.175,23.457 199.1,23.532 C29.2@199.1,27.2 ; v1(207.175,40.575) 207.25,40.5 210.165,40.5 216.49,46.825 216.596,109.261 216.596,119.056 v1(216.49,119.163) ; 119.208,95.338 118.065,96.481 118.065,103.161 119.32,104.417 119.32,129.385 120.815,130.88 120.815,130.974
  Top Layer w1: DC6.A3@139.2,5.325 DC6.B3@139.2,7.825 DC6.C3@139.2,10.325
  Bottom Layer w0.5: 167.849,4.253 167.849,10.705
  Bottom Layer w0.6: v1(21.425,145.6) 21.425,144.525 21.9,144.05 27.125,144.05 27.275,144.2 v1(27.275,145.675) ; U33.1@24.1,128.743 24.663,128.18 42.965,128.18 U37.1@43.529,128.743 45.047,127.225 57.225,127.225 58.525,125.925 60.504,125.925 U34.1@63.322,128.743 65.64,126.425 83.313,126.425 U38.1@85.632,128.743 86.607,128.743 87.602,127.748 94.493,127.748 v1(101.097,134.352) ; U62.1@89.401,79.729 95.687,73.443 117.338,73.443 U61.1@123.625,79.729 ; v1(121.875,130.974) 124.669,128.18 127.458,128.18 128.021,128.743 U35.1@129.154,128.743 136.112,121.786 v1(145.918,121.786) ; DC6.A3@139.175,5.325 139.175,3.55 140.875,1.85 165.445,1.85 167.849,4.253 ; U39.1@152.997,128.743 155.465,126.275 172.682,126.275 U36.1@175.097,128.69 177.162,126.625 196.975,126.625 197.965,127.615 U40.1@198.369,127.615 206.822,119.163 v1(216.49,119.163) ; 167.849,10.705 180.651,23.507 v1(194.425,23.507) ; v1(199.05,27.25) 203.925,32.125 203.925,37.95 206.55,40.575 v1(207.175,40.575)
  other v1: 199.2,23.532 194.725,27.275 27.881,121.302 27.963,124.827 117.318,134.7 117.35,138.575
-23V: DC6.A2 DC6.B2 DC6.C2 R29.2 R30.2 R31.2 R32.2 R33.2 R34.2 R37.2 R38.2 R39.2 R42.2 R54.1 R56.1 R57.1 R58.1 R59.1 R60.1 R61.1 R62.1 | length 264.7
  Top Layer w0.6: R30.2@38.925,77.125 38.925,74.55 48.682,64.793 48.682,49.575 ; R29.2@48.682,46.05 48.682,49.575 ; v1(51.55,49.6) 48.707,49.6 48.682,49.575 ; v1(78.457,45.825) 80.957,48.325 83.975,48.325 ; R34.2@84.007,45.825 84.007,48.293 83.975,48.325 ; v1(93.675,45.825) 93.675,48.225 93.75,48.3 93.725,48.325 ; v1(103.2,45.825) 103.2,44.011 103.125,43.936 ; v1(109.075,45.825) 109.075,44.061 108.95,43.936 ; R37.2@114.232,45.825 114.232,44.043 114.125,43.936 ; v1(117.982,17.7) v1(125.776,17.7) ; v1(124.157,45.825) 124.157,44.179 124.4,43.936 ; v1(126.841,43.141) 126.046,43.936 124.4,43.936 ; DC6.C2@136.7,10.325 136.7,11.8 137.588,12.688 141.238,12.688 143.582,15.032 R58.1@143.582,17.7 145.266,19.383 145.266,38.916 R57.1@146.35,40 ; R38.2@139.232,76.7 R42.2@139.232,73.5 144.175,68.557 144.175,45.808 ; v1(141.306,45.808) 144.175,45.808 ; R60.1@151.225,44.2 151.118,44.093 151.118,39.443 150.25,38.575 147.775,38.575 R57.1@146.35,40 ; 83.975,48.325 93.725,48.325 ; 93.725,48.325 97.15,48.325 98.425,47.05 98.425,44.454 98.943,43.936 103.125,43.936 ; 103.125,43.936 108.95,43.936 ; 108.95,43.936 114.125,43.936 ; 114.125,43.936 124.4,43.936 ; 144.175,45.808 144.175,42.45 146.35,40.275 R57.1@146.35,40
  Top Layer w1: DC6.A2@136.7,5.325 DC6.B2@136.7,7.825 DC6.C2@136.7,10.325
  Bottom Layer w0.6: v1(51.55,49.6) 52.348,49.6 52.344,49.597 76.578,49.597 78.457,47.718 v1(78.457,45.825) ; v1(125.776,17.7) 131.301,12.175 134.825,12.175 DC6.C2@136.675,10.325 ; v1(126.841,43.141) 138.639,43.141 v1(141.306,45.808)
  other v1: 114.257,45.9 139.257,73.575 139.257,76.775 38.925,77.175
"a pr": DC5.A15 DC5.B15 DC5.C15 | length 5
  Top Layer w0.4: DC5.A15@54.175,5.325 DC5.C15@54.175,10.325
"b pr": DC5.A16 DC5.B16 DC5.C16 | length 5
  Top Layer w0.4: DC5.A16@56.675,5.325 DC5.C16@56.675,10.325
Bhod_c1a: DC5.A7 U4.10 | length 82.2
  Top Layer w0.4: U4.10@24.407,69.55 24.407,71.507 25.45,72.55 27.975,72.55 30.587,69.938 30.587,17.308 27.996,14.717 27.996,9.579 28.419,9.156 29.819,9.156 30.435,8.54 30.435,4.812 31.095,4.152 33.002,4.152 DC5.A7@34.175,5.325
Bhod_c1b: DC5.B7 U4.12 | length 78.5
  Top Layer w0.4: U4.12@21.907,69.55 21.907,71.665 23.812,73.57 28.453,73.57 34.846,67.178 34.846,29.63 35.337,29.139 35.337,8.987 DC5.B7@34.175,7.825
Bhod_c1rc: DC5.C7 U6.5 | length 18.3
  Top Layer w0.4: U6.5@24.357,22.5 24.357,20.475 v1(27.625,17.207)
  Bottom Layer w0.4: v1(27.625,17.207) 31.101,17.207 34.175,14.134 DC5.C7@34.175,10.325
Bhod_c2a: DC5.A9 U5.1 | length 48.4
  Top Layer w0.4: U5.1@19.375,40.1 19.375,41.439 19.985,42.049 v1(20.859,42.049)
  Bottom Layer w0.4: v1(20.859,42.049) 20.859,30.65 35.515,15.994 35.515,7.251 36.175,6.59 37.91,6.59 DC5.A9@39.175,5.325
Bhod_c2b: DC5.B9 U5.5 | length 42.7
  Top Layer w0.4: U5.5@24.375,40.1 v1(24.375,42.088)
  Bottom Layer w0.4: v1(24.375,42.088) 24,41.713 24,33.573 24.4,33.173 24.4,28.271 38.004,14.667 38.004,8.996 DC5.B9@39.175,7.825
Bhod_c2rc: DC5.C9 U6.10 | length 29
  Top Layer w0.4: U6.10@24.407,33.175 24.407,31.825 v1(25.607,30.625)
  Bottom Layer w0.4: v1(25.607,30.625) 39.175,17.057 DC5.C9@39.175,10.325
Bhod_c3a: DC5.A11 U5.10 | length 53.9
  Top Layer w0.4: v1(24.064,49.191) 24.425,49.552 U5.10@24.425,50.775
  Bottom Layer w0.4: v1(24.064,49.191) 24.064,43.668 42.83,24.902 42.83,6.67 DC5.A11@44.175,5.325